# EAGLE board led_board (EAGLE 9.6.2)

Size 30 x 20 mm. Coordinates in mm from the lower left corner, seen from the top.
Outline: 0,0 30,0 30,20 0,20 0,0
Copper layers used: 

## Footprints (pad centres in the part's own frame; a part is rotated, then mirrored left to right if it is on the bottom)
LED0603 = smd 0.8 x 0.9: 1 -0.8,0; 2 0.8,0

## Placement (x,y rotation side)
J1  spare  [LED0603]  25,15 0 top
J2  spare  [LED0603]  25,5 0 top

## Library data of the parts
J1 J2 = tutorial